# Altium PCB Atrium_Power_Island.PcbDoc
Units mm, origin at the board's own origin, x right, y up, seen from the top; angles counter-clockwise.
Board outline 34.65 x 22.82 mm, 6 copper layers (Top Layer, Inner1, Inner2, Inner3, Inner4, Bottom Layer), stack 0.82 mm thick; 18 components, 17 nets, 83 pads, 67 vias.
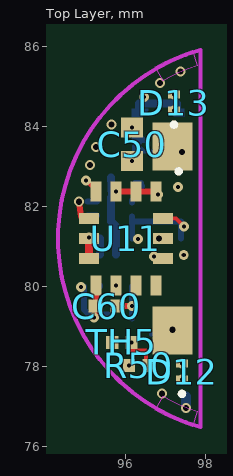
[diagram p0: Top Layer view]
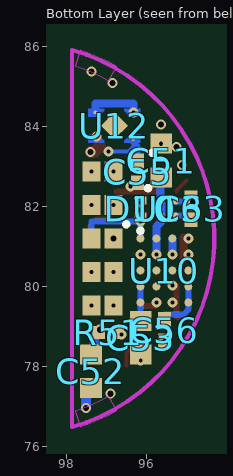
[diagram p1: Bottom Layer view, seen from below]
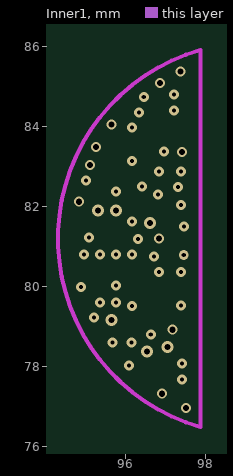
[diagram p2: Inner1]
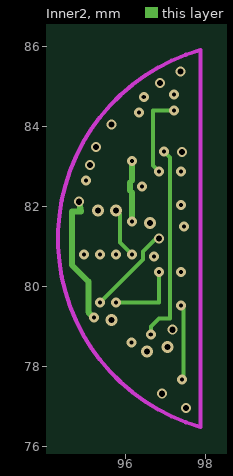
[diagram p3: Inner2]
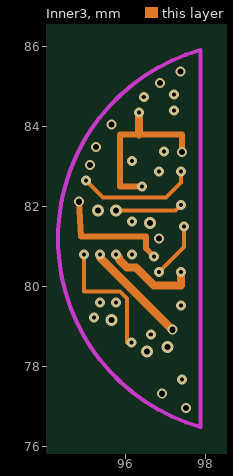
[diagram p4: Inner3]
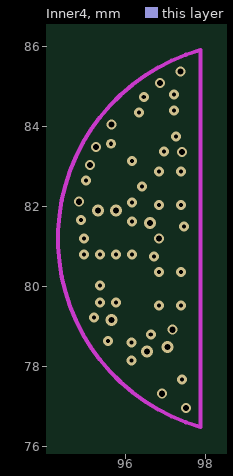
[diagram p5: Inner4]

## Layer stack, top to bottom
Top Solder Mask Layer: solder mask 0.012, Dk 3.8
Top Layer: signal copper 0.035
Dielectric1: surface 0.0964, 2313 PP, Dk 4.1
Inner1: signal copper 0.0152
Dielectric2: surface 0.15, Core 0.15, Dk 4.6
Inner2: signal copper 0.0152
Dielectric3: surface 0.1964, 2x2313 PP, Dk 4.1
Inner3: signal copper 0.0152
Dielectric4: surface 0.15, Core 0.15, Dk 4.6
Inner4: signal copper 0.0152
Dielectric5: surface 0.0964, 2313 PP, Dk 4.1
Bottom Layer: signal copper 0.035
Bottom Solder Mask Layer: solder mask 0.012, Dk 3.8

## Board outline
104.495,69.85 69.85,69.85 69.85,92.671 104.495,92.671

## Design rules (kind name [scope] priority, off if disabled: settings)
BoardOutlineClearance copperThickness1oz [All] p0: genericclearance=0.254 ignorepadtopadclearanceinfootprint=FALSE except(0: Arc-SplitContinuation Track-SplitContinuation SMDPad-SplitContinuation THPad-SplitContinuation Via-SplitContinuation Fill-SplitContinuation Poly-SplitContinuation Region-SplitContinuation Text-SplitContinuation)
BoardOutlineClearance copperThickness2oz [All] p0: genericclearance=0.254 ignorepadtopadclearanceinfootprint=FALSE except(0: Arc-SplitContinuation Track-SplitContinuation SMDPad-SplitContinuation THPad-SplitContinuation Via-SplitContinuation Fill-SplitContinuation Poly-SplitContinuation Region-SplitContinuation Text-SplitContinuation)
BoardOutlineClearance otherClearance [All] p0: genericclearance=0.254 ignorepadtopadclearanceinfootprint=FALSE except(0: Arc-SplitContinuation Track-SplitContinuation SMDPad-SplitContinuation THPad-SplitContinuation Via-SplitContinuation Fill-SplitContinuation Poly-SplitContinuation Region-SplitContinuation Text-SplitContinuation)
Clearance copperThickness1oz [All] p1: gap=0.178 ignorepadtopadclearanceinfootprint=FALSE
Clearance copperThickness2oz [All] p1: gap=0.178 ignorepadtopadclearanceinfootprint=FALSE
Clearance otherClearance [All] p1: gap=0.178 ignorepadtopadclearanceinfootprint=FALSE
DiffPairsRouting differentialPair [All] p1: maxuncoupledlength=10 minlimit=6 maxlimit=Infinity mostfreqgap=6 toplayer_minwidth=5 toplayer_prefwidth=10 toplayer_maxwidth=100 bottomlayer_minwidth=5 bottomlayer_prefwidth=10 bottomlayer_maxwidth=100 midlayer1_minwidth=5 midlayer1_prefwidth=10 midlayer1_maxwidth=100 midlayer2_minwidth=5 midlayer2_prefwidth=10 midlayer2_maxwidth=100 midlayer3_minwidth=5 midlayer3_prefwidth=10 midlayer3_maxwidth=100 midlayer4_minwidth=5 midlayer4_prefwidth=10 midlayer4_maxwidth=100
PasteMaskExpansion pasteMaskExpansion [All] p1: expansion=0
PlaneConnect innerPlane [All] p1: planeconnectstyle=Relief reliefexpansion=0.508 reliefentries=4 reliefconductorwidth=0.15 reliefairgap=0.15
PolygonConnect copperRegion [All] p1: connectstyle=Relief reliefentries=4 reliefconductorwidth=5.9055 polygonreliefangle="90 Angle" airgapwidth=5.9055
RoutingVias viaSize [All] p1: viastyle="Through Hole" holewidth=5.9056 minholewidth=5.9056 maxholewidth=248.0314 width=5.9056 minwidth=5.9056 maxwidth=248.0314
RoutingVias microVia [All] p1: viastyle="Through Hole" holewidth=3.937 minholewidth=3.937 maxholewidth=248.0314 width=3.937 minwidth=3.937 maxwidth=248.0314
RoutingVias buriedVia [All] p1: viastyle="Through Hole" holewidth=5.9056 minholewidth=5.9056 maxholewidth=248.0314 width=5.9056 minwidth=5.9056 maxwidth=248.0314
SolderMaskExpansion solderMaskExpansion [IsVia] p1: useseparateexpansions=TRUE expansion=-1000 expansionbottom=-1000
SolderMaskExpansion solderMaskExpansion [All] p2: useseparateexpansions=TRUE expansion=2 expansionbottom=2
Width copperThickness1oz [All] p1: maxlimit=100 minlimit=4 preferedwidth=4
Width copperThickness2oz [All] p1: maxlimit=100 minlimit=8 preferedwidth=10
Width RF_124 [All] p1: maxlimit=5 minlimit=5 preferedwidth=5
Width SW_200 [All] p1: maxlimit=39 minlimit=8 preferedwidth=10
Width PWR_150 [All] p1: maxlimit=39 minlimit=6 preferedwidth=8
Width DEC_150 [All] p1: maxlimit=20 minlimit=6 preferedwidth=6
Width SIG_100 [All] p1: maxlimit=10 minlimit=4 preferedwidth=4

## Components (designator, comment, footprint, x,y, rotation, side; value= is the part's Value field where it differs from the comment)
C50 "10uF" C0402 96.151,83.548 r90 top
C51 "22uF" C0402 95.63,83.142 r90 bottom
C52 "10uF" C0402 97.385,77.872 r270 bottom
C53 "4.7uF" C0402 96.14,78.712 r270 bottom
C55 "100nF" C0201 96.22,82.857 r270 bottom
C56 "1uF" C0201 95.55,78.902 r270 bottom
C60 "100nF" C0201 95.52,79.502 r0 top
C63 "1uF" C0201 94.88,81.932 r270 bottom
D10 "ESD5V3U04-0201" X3-DFN0603-2_L0.6-W0.3-RD 96.15,81.942 r90 bottom
D12 "ESD5V3U04-0201" X3-DFN0603-2_L0.6-W0.3-RD 97.4,77.862 r90 top
D13 "ESD5V3U04-0201" X3-DFN0603-2_L0.6-W0.3-RD 97.2,84.592 r90 top
R50 "10kΩ" R0201 96.32,78.022 r180 top
R51 "330Ω" R0201 96.95,78.842 r180 bottom
TH5 "NCP03XH103F05RL" R0201 95.899,78.593 r180 top
U10 "BQ21061YFPR" DSBGA-20_L2.0-W1.6-R4-C5-P0.40-BL-1 95.55,80.392 r270 bottom
U11 "LSM6DSV16BXTR" LGA-14L_L3.0-W2.5-P0.50-TL 96,81.192 r270 top
U12 "AP6683" DFN-4_L1.0-W1.0-P0.65-BL-EP 96.8,84.012 r90 bottom
U13 "TPS7A0218PYCHR" WLCSP-4_L0.6-W0.6-P0.35-R2-C2-TL 95.45,81.942 r180 bottom

## Footprints (in the part's own frame and the unit in brackets; to place one, negate y for a bottom-side part, rotate by r counter-clockwise, add the part's x,y. Pads: shape width x height; smd on the part's side, far side on the other; paste and mask are expansions set on the pad)
C0201 [mm]
  rect 0.368x0.324 smd paste-100 mask+0.051: 1(-0.274,0) 2(0.274,0)
C0402 [mm]
  rect 0.5x0.54 smd paste+0 mask+0.051: 1(-0.42,0) 2(0.42,0)
DFN-4_L1.0-W1.0-P0.65-BL-EP [mm]
  round 0.092 smd: 1(-0.333,-0.475) 2(0.333,-0.474) 3(0.333,0.475) 4(-0.333,0.475)
  rect 0.48x0.48 smd rot 45: 5(0.004,0.001)
  Top Layer region: 0.425,-0.649 0.225,-0.649 0.225,-0.399 0.225,-0.399 0.375,-0.249 0.425,-0.249
  Top Layer region: -0.225,-0.4 -0.225,-0.65 -0.425,-0.65 -0.425,-0.25 -0.375,-0.25
  Top Layer region: -0.425,0.651 -0.225,0.651 -0.225,0.401 -0.225,0.401 -0.375,0.251 -0.425,0.251
  Top Layer region: 0.425,0.651 0.225,0.651 0.225,0.401 0.225,0.401 0.375,0.251 0.425,0.251
  silkscreen extent -0.78,-1.06 -0.58,-0.85
DSBGA-20_L2.0-W1.6-R4-C5-P0.40-BL-1 [mm]
  round 0.2 smd paste-100 mask+0.051: A1(-0.8,-0.6) A2(-0.8,-0.2) A3(-0.8,0.2) A4(-0.8,0.6) B1(-0.4,-0.6) B2(-0.4,-0.2) B3(-0.4,0.2) B4(-0.4,0.6) C1(0,-0.6) C2(0,-0.2) C3(0,0.2) C4(0,0.6) D1(0.4,-0.6) D2(0.4,-0.2) D3(0.4,0.2) D4(0.4,0.6) E1(0.8,-0.6) E2(0.8,-0.2) E3(0.8,0.2) E4(0.8,0.6)
  silkscreen extent -1.26,-1.06 -1.05,-0.85
LGA-14L_L3.0-W2.5-P0.50-TL [mm]
  rect 0.5x0.28 smd: 1(-1.175,0.75) 2(-1.175,0.25) 3(-1.175,-0.25) 4(-1.175,-0.75) 8(1.175,-0.75) 9(1.175,-0.25) 10(1.175,0.25) 11(1.175,0.75)
  rect 0.28x0.5 smd: 5(-0.5,-0.925) 6(0,-0.925) 7(0.5,-0.925) 12(0.5,0.925) 13(0,0.925) 14(-0.5,0.925)
  silkscreen extent -1.78,1.22 -1.58,1.42
R0201 [mm]
  rect 0.303x0.324 smd paste-100 mask+0.051: 1(-0.242,0) 2(0.242,0)
WLCSP-4_L0.6-W0.6-P0.35-R2-C2-TL [mm]
  round 0.158 smd paste-100 mask+0.05: A1(-0.175,0.175) A2(0.175,0.175) B1(-0.175,-0.175) B2(0.175,-0.175)
  silkscreen extent -0.61,0.41 -0.41,0.61
X3-DFN0603-2_L0.6-W0.3-RD [mm]
  rect 0.2x0.3 smd: 1(-0.2,0) 2(0.2,0)
  silkscreen extent -0.66,-0.1 -0.45,0.1

## Free pads (board coordinates)
  rect 1x1.2 smd: BT1(97.16,78.892) BT2(97.16,83.492)
  rect 0.45x0.5 smd far side paste+0 mask+0: JP1(97.375,79.512) JP2(97.375,80.353) JP3(97.375,81.191) JP4(97.375,82.032) JP5(97.375,82.873) JP6(96.824,79.512) JP7(96.824,80.353) JP8(96.824,81.191) JP9(96.824,82.032) JP10(96.824,82.873)

## Via types
v1: diameter 0.25, hole 0.099, Inner1 to Bottom Layer, 16 vias
v2: diameter 0.25, hole 0.15, Top Layer to Bottom Layer, 8 vias
v3: diameter 0.25, hole 0.099, Top Layer to Inner1, 8 vias
v4: diameter 0.25, hole 0.099, Top Layer to Inner4, 7 vias
v5: diameter 0.25, hole 0.099, Inner4 to Bottom Layer, 7 vias
v6: diameter 0.3, hole 0.15, Inner1 to Inner4, 5 vias
v7: diameter 0.249, hole 0.102, Top Layer to Inner1, 5 vias
v8: diameter 0.249, hole 0.152, Top Layer to Bottom Layer, 3 vias
v9: diameter 0.249, hole 0.102, Top Layer to Inner4, 3 vias
v10: diameter 0.249, hole 0.102, Inner4 to Bottom Layer, 3 vias
v11: diameter 0.249, hole 0.102, Inner1 to Bottom Layer, 1 vias
v12: diameter 0.3, hole 0.152, Inner1 to Inner4, 1 vias

## Nets (pads, with @x,y where several pads share a name; then routed paths per layer and width w, separated by ;. In a path a pad name is that pad's centre, name@x,y a point inside that pad or via, vN(x,y) a via of type N, cw(c..) or ccw(c..) an arc to the next point about the centre after c; other vN are vias at no path point)
BQ_VDD: C53.1 U10.D1 U10.E1 | length 0.8
  Bottom Layer w0.15: C53.1@96.151,79.192 96.151,79.591 U10.D1@96.151,79.992
CELL_N: C55.2 pad.BT2 U12.2 U12.3 | length 6.3
  Top Layer w0.3: pad.BT2 97.3,83.352 v2(97.4,83.352)
  Inner3 w0.15: v1(96.4,82.492) 95.85,82.492 95.85,83.792 96.326,83.792 97.4,83.792 v2(97.4,83.352)
  Inner3 w0.2: 96.326,83.792 v1(96.326,84.338)
  Bottom Layer w0.15: C55.2 96.37,82.582 v1(96.4,82.492)
  Bottom Layer w0.2: v1(96.326,84.338) 96.326,84.562 97.276,84.562 U12.3@97.276,84.338
CELL_P: C52.1 pad.BT1 R51.1 U10.A3 U10.B3 | length 3.6
  Top Layer w0.3: pad.BT1 v8(97.16,78.912)
  Inner3 w0.2: v1(95.351,80.792) 95.351,80.717 97.16,78.908 v8(97.16,78.912)
  Bottom Layer w0.2: v1(95.351,80.792) U10.A3@95.351,81.191
  Bottom Layer w0.25: v8(97.16,78.912) 97.16,78.874 R51.1@97.193,78.842 ; R51.1@97.193,78.839 97.3,78.732 C52.1@97.3,78.442
CHG_PG: pad.JP4 U10.B1 | length 2.9
  Inner2 w0.1: v6(95.75,81.892) 95.85,81.792 95.85,81.092 v1(96.151,80.792)
  Inner3 w0.1: v6(95.75,81.892) 97.235,81.892 v1(97.375,82.032)
GND: C50.2 C51.2 C52.2 C53.2 C56.2 C60.2 C63.2 D10.2 D12.2 D13.2 pad.JP6 pad.JP9 R50.2 TH5.2 U10.A4 U10.D3 U11.1 U11.2 U11.3 U11.6 U11.7 U11.9 U12.4 U13.B2 | length 2.5
  Top Layer w0.15: v3(95.75,82.367) U11.2 U11.1 ; C60.2@95.796,79.502 v3(96.15,79.502)
  Top Layer w0.2: U11.7 U11.6 v3(95.074,81.221)
  Bottom Layer w0.15: 95.042,81.768 U13.B2 ; U10.D3@95.351,79.992 v5(95.351,80.022) ; v5(96.151,82.092) D10.2@96.151,82.141
  Bottom Layer w0.25: v2(97.504,76.959) C52.2@97.504,77.242
  other v2: 95.104,83.028 95.25,83.479 95.634,84.037 96.85,85.079 97.368,85.368
  other v3: 96.077,78.021 97.401,78.062 96.3,81.179 96.8,82.292 97.3,82.479
  other v4: 97.2,84.793
  other v5: 96.141,78.142 96.824,79.512 94.95,81.191 96.824,82.032 97.25,83.742
  other v6: 96.531,78.368 97.044,78.477 96.599,81.581 95.3,81.892
  other v7: 95.658,78.593 94.88,79.979 95.75,80.018 97.444,80.779 96.151,83.969
  other v8: 96.9,77.312
  other v9: 96.445,84.735
  other v10: 95.549,78.628 94.879,81.659 95.631,83.561
  other v12: 95.635,79.156
I2C_SCL: pad.JP8 U10.E3 U11.13 | length 2.3
  Inner2 w0.1: v1(95.351,79.591) 96.425,80.665 96.425,80.867 96.749,81.191 v2(96.824,81.191)
I2C_SDA: pad.JP7 U10.E2 U11.14 | length 3.8
  Top Layer w0.1: U11.14@96.926,81.692 97.251,81.692 v4(97.45,81.492)
  Inner2 w0.1: v1(95.75,79.591) 96.824,79.591 v1(96.824,80.353)
  Inner3 w0.1: v1(96.824,80.353) 97.45,80.979 v4(97.45,81.492)
IMU_INT1: pad.JP5 U11.4 | length 3.4
  Top Layer w0.1: v4(95,82.642) 95.249,82.393 U11.4
  Inner3 w0.1: v4(95,82.642) 95.425,82.217 97,82.217 97.375,82.592 v1(97.375,82.873)
SWDCLK: D13.1 pad.JP10 | length 2.1
  Inner2 w0.1: v1(96.824,82.873) 96.675,83.021 96.675,84.392 v4(97.2,84.391)
SWDIO: D12.1 pad.JP1 | length 1.9
  Inner2 w0.1: v1(97.375,79.512) 97.44,79.447 97.44,77.702 v4(97.401,77.663)
TS: R50.1 TH5.1 U10.B4 | length 4.2
  Top Layer w0.1: v4(96.141,78.593) 96.141,78.392 96.5,78.392 R50.1@96.5,78.021
  Inner3 w0.1: v1(94.95,80.792) 94.95,79.867 95.85,79.867 96.025,79.692 96.025,78.592 v4(96.141,78.593)
U12_EP: U12.5
U12_VDD: C55.1 R51.2 U12.1 | length 6.5
  Inner2 w0.1: v11(96.62,78.792) 96.62,78.992 96.82,79.192 97.1,79.192 97.1,83.222 v1(96.95,83.372)
  Bottom Layer w0.1: 96.324,83.596 96.324,83.498 96.45,83.372 v1(96.95,83.372) ; v11(96.62,78.792) 96.658,78.792 R51.2
  Bottom Layer w0.15: C55.1 96.22,83.492 96.324,83.596 U12.1@96.324,83.688
VDD_IMU: C60.1 C63.1 U11.5 U11.8 U11.12 U13.A2 | length 7.9
  Top Layer w0.15: v8(94.83,82.112) U11.5@94.88,81.742 ; v9(95.2,79.212) 95.247,79.259 95.248,79.502 U11.8
  Inner2 w0.15: v8(94.83,82.112) 94.88,81.867 94.65,81.867 94.65,80.527 95.06,80.117 95.06,79.352 v9(95.2,79.212)
  Inner3 w0.15: v8(94.83,82.112) 94.88,81.242 96.5,81.242 96.5,80.942 v4(96.7,80.742)
  Bottom Layer w0.15: 95.042,82.118 U13.A2
VIN: C50.1 D10.1 pad.JP3 U10.A1 | length 3.8
  Inner2 w0.15: v1(96.151,81.612) 96.151,82.341 96.1,82.392 96.1,82.592 96.15,82.642 v9(96.151,83.128)
  Bottom Layer w0.15: U10.A1@96.151,81.191 v1(96.151,81.612) ; D10.1@96.151,81.742 v1(96.151,81.612) ; pad.JP3 97.375,81.612 v1(96.151,81.612)
VINLS: C56.1 U10.D4 U10.E4 | length 1.2
  Bottom Layer w0.15: U10.D4 U10.E4 94.95,79.412 95.07,79.292 C56.1@95.549,79.292
VSYS: C51.1 pad.JP2 U10.A2 U10.B2 U13.A1 U13.B1 | length 4.3
  Inner3 w0.2: v1(95.75,80.792) 95.825,80.717 95.825,80.667 96.025,80.467 96.25,80.467 96.7,80.017 97.375,80.017 v1(97.375,80.353)
  Bottom Layer w0.2: C51.1 95.651,82.242 95.625,82.216 U13.A1 U13.B1 95.625,81.617 95.75,81.492 U10.A2 v1(95.75,80.792)
pads on no net: U10.C1 U10.C2 U10.C3 U10.C4 U10.D2 U11.10 U11.11

## Polygon pours and split planes (outlines as drawn)
GND on Inner1 (solid, remove dead copper): 94.081,86.106 94.081,76.2 98.145,76.2 98.145,86.106
GND on Inner4 (solid, remove dead copper): 94.081,86.106 94.081,76.2 98.145,76.2 98.145,86.106

## Keep-outs
Top Layer:
  region: 97.658,85.896 97.782,85.516 97.564,85.438 97.349,85.349 97.14,85.249 96.936,85.138 96.736,85.485 96.959,85.605 97.187,85.714 97.42,85.811 97.658,85.896
  region: 96.736,76.899 96.936,77.246 97.14,77.135 97.349,77.035 97.564,76.946 97.782,76.868 97.658,76.488 97.42,76.573 97.187,76.67 96.959,76.779 96.736,76.899
Bottom Layer:
  region: 97.658,85.896 97.782,85.516 97.564,85.438 97.349,85.349 97.14,85.249 96.936,85.138 96.736,85.485 96.959,85.605 97.187,85.714 97.42,85.811 97.658,85.896
  region: 96.736,76.899 96.936,77.246 97.14,77.135 97.349,77.035 97.564,76.946 97.782,76.868 97.658,76.488 97.42,76.573 97.187,76.67 96.959,76.779 96.736,76.899
Board Outline Layer:
  lines w0.102: 97.86,76.479 97.86,85.905 ccw(c99.2,81.192) 97.86,76.479

## Silkscreen, mask and mechanical layers (free items; w line width, h text height)
Top Solder Mask Layer:
  region: 96.936,77.246 96.989,77.215 97.044,77.185 97.098,77.156 97.154,77.128 97.209,77.101 97.265,77.074 97.321,77.048 97.378,77.023 97.435,76.998 97.492,76.975 97.549,76.952 97.607,76.93 97.665,76.909 97.724,76.888 97.782,76.868 97.658,76.488 97.594,76.51 97.53,76.532 97.467,76.555 97.404,76.579 97.342,76.604 97.279,76.63 97.217,76.656 97.156,76.684 97.095,76.712 97.034,76.741 96.974,76.771 96.914,76.802 96.854,76.833 96.795,76.865 96.736,76.899
  region: 97.782,85.516 97.724,85.496 97.665,85.475 97.607,85.454 97.549,85.432 97.492,85.409 97.435,85.386 97.378,85.361 97.321,85.336 97.265,85.31 97.209,85.283 97.154,85.256 97.098,85.228 97.044,85.199 96.989,85.169 96.936,85.138 96.736,85.485 96.795,85.519 96.854,85.551 96.914,85.582 96.974,85.613 97.034,85.643 97.095,85.672 97.156,85.7 97.217,85.728 97.279,85.754 97.342,85.78 97.404,85.805 97.467,85.829 97.53,85.852 97.594,85.874 97.658,85.896
Bottom Solder Mask Layer:
  region: 96.936,77.246 96.989,77.215 97.044,77.185 97.098,77.156 97.154,77.128 97.209,77.101 97.265,77.074 97.321,77.048 97.378,77.023 97.435,76.998 97.492,76.975 97.549,76.952 97.607,76.93 97.665,76.909 97.724,76.888 97.782,76.868 97.658,76.488 97.594,76.51 97.53,76.532 97.467,76.555 97.404,76.579 97.342,76.604 97.279,76.63 97.217,76.656 97.156,76.684 97.095,76.712 97.034,76.741 96.974,76.771 96.914,76.802 96.854,76.833 96.795,76.865 96.736,76.899
  region: 97.782,85.516 97.724,85.496 97.665,85.475 97.607,85.454 97.549,85.432 97.492,85.409 97.435,85.386 97.378,85.361 97.321,85.336 97.265,85.31 97.209,85.283 97.154,85.256 97.098,85.228 97.044,85.199 96.989,85.169 96.936,85.138 96.736,85.485 96.795,85.519 96.854,85.551 96.914,85.582 96.974,85.613 97.034,85.643 97.095,85.672 97.156,85.7 97.217,85.728 97.279,85.754 97.342,85.78 97.404,85.805 97.467,85.829 97.53,85.852 97.594,85.874 97.658,85.896
Document Layer:
  text "LAYOUT NOTES - POWER ISLAND (EVT)  6L HDI 1+4+1, 0.82 mm, same stack and via set as the radio island" at 76.2,86.092 h0.23
  text "Cell path: TAB- > U12 AP6683 > GND short and wide. CELL+/VSYS/VIN >= 0.20 mm (0.30 on the flex)" at 76.2,85.772 h0.18
  text "U10 BQ21061 (bottom): C51 22u at PMID, C50 at IN, C52 at BAT, C53 4.7u at VDD. Laser L6-L5 / skip L6-L2 vias in pad (filled)" at 76.2,85.452 h0.18
  text "U13 LDO (bottom) feeds U11 only; input from C51 (PMID), C63 out (also VDDIO) at the balls" at 76.2,85.132 h0.18
  text "U11 IMU on L1 over solid L2, nothing switching nearby. INT1 has no pull" at 76.2,84.812 h0.18
  text "TH5 beside the cell (charger TS: 10k || NTC). Bottom parts <= 0.80 mm" at 76.2,84.492 h0.18
  text "Jumper pads: two rows at x 3.125 / 3.675 (bottom). Purple bands = clamps, no parts" at 76.2,84.172 h0.18